# Altium PCB ScreenerMobo.PcbDoc (part 5 of 5)
Units mm, origin at the board's own origin, x right, y up, seen from the top; angles counter-clockwise.
Board outline 145 x 180 mm, 2 copper layers (Top Layer, Bottom Layer); 434 components, 355 nets, 1806 pads, 3000 vias.
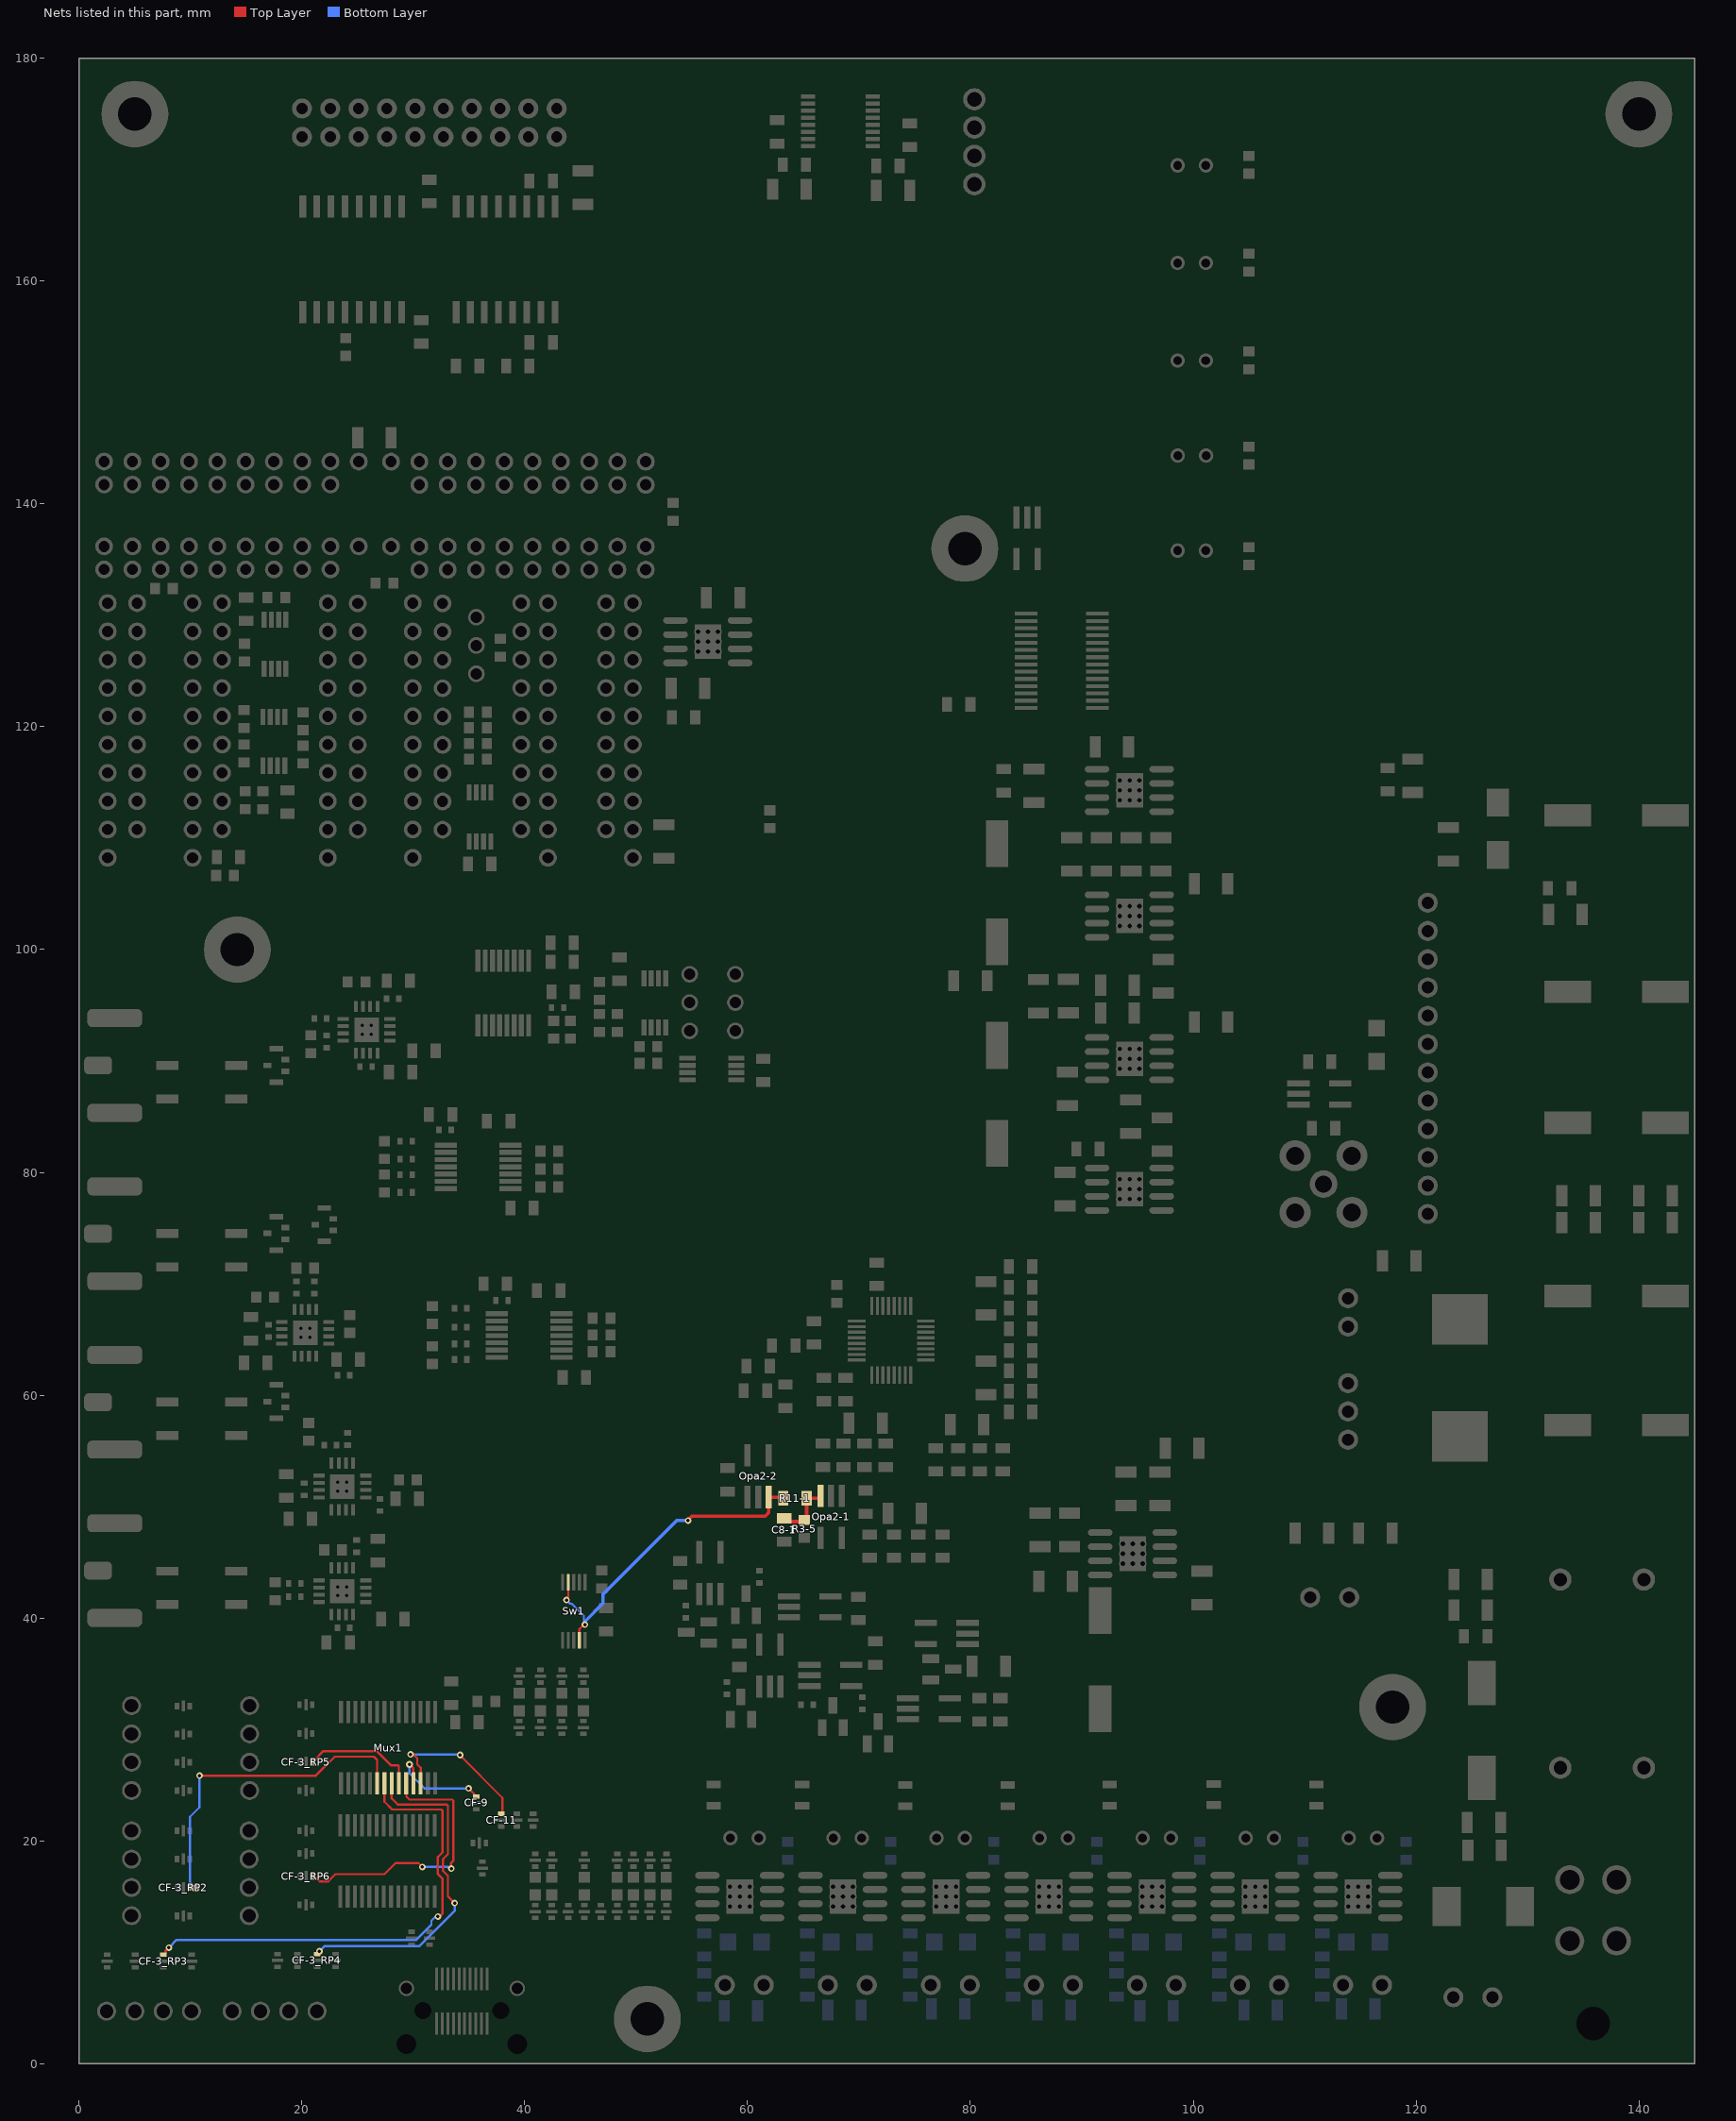
[diagram p5: the nets of this part, all layers, seen from the top]

## Via types
v1: diameter 0.6, hole 0.3, Top Layer to Bottom Layer, tented both sides, 1967 vias
v2: diameter 0.5, hole 0.25, Top Layer to Bottom Layer, tented both sides, 1025 vias
v3: diameter 0.9, hole 0.5, Top Layer to Bottom Layer, tented both sides, 8 vias

## Nets (pads, with @x,y where several pads share a name; then routed paths per layer and width w, separated by ;. In a path a pad name is that pad's centre, name@x,y a point inside that pad or via, vN(x,y) a via of type N, cw(c..) or ccw(c..) an arc to the next point about the centre after c; other vN are vias at no path point) (continued)
VRTDP2: CF-3_RP2.2 Mux1.20 | length 30.2
  Top Layer w0.2: CF-3_RP2.2@9.925,15.8 9.975,15.75 v1(10.5,15.75) ; v1(10.8,25.85) 21.25,25.85 22.95,27.55 26.45,27.55 26.75,27.25 Mux1.20@26.75,25.15
  Bottom Layer w0.2: v1(10.5,15.75) 9.95,16.3 9.95,22.15 10.8,23 v1(10.8,25.85)
VRTDP3: CF-3_RP3.2 Mux1.21 | length 43.7
  Top Layer w0.2: CF-3_RP3.2@7.567,9.775 7.658,9.775 7.758,9.875 7.758,10.108 v1(8.05,10.4) ; Mux1.21@27.4,25.15 27.4,23.5 28.1,22.8 32.507,22.8 32.624,22.683 32.624,18.974 32.2,18.55 32.2,17 32.624,16.576 32.624,13.459 32.507,13.341 32.45,13.341 32.308,13.2 v1(32.2,13.2)
  Bottom Layer w0.2: v1(8.05,10.4) 8.75,11.1 30.25,11.1 31.617,12.467 31.617,12.583 31.623,12.589 31.623,12.823 31.923,13.123 32.123,13.123 v1(32.2,13.2)
VRTDP4: CF-3_RP4.2 Mux1.22 | length 30.8
  Top Layer w0.2: CF-3_RP4.2@21.375,9.85 CF-3_RP4.2@21.35,9.825 21.45,9.825 21.55,9.925 21.55,10.025 21.575,10.05 v1(21.575,10.075) ; Mux1.22@28.05,25.15 28.05,23.8 28.6,23.25 32.983,23.25 33.1,23.133 33.1,18.8 32.65,18.35 32.65,17.3 33.1,16.85 33.1,15 v1(33.7,14.4)
  Bottom Layer w0.2: v1(21.575,10.075) 22.05,10.55 30.55,10.55 33.7,13.7 v1(33.7,14.4)
VRTDP5: CF-3_RP5.2 Mux1.23 | length 10.4
  Top Layer w0.2: CF-3_RP5.2@20.925,27.067 20.925,27.167 21.025,27.267 21.125,27.267 21.908,28.05 26.7,28.05 27.975,26.775 28.625,26.775 28.7,26.7 Mux1.23@28.7,25.15
VRTDP6: CF-3_RP6.2 Mux1.24 | length 25.3
  Top Layer w0.2: CF-3_RP6.2@20.925,16.8 20.925,16.75 21.025,16.65 21.3,16.65 21.6,16.35 22.35,16.35 23,17 27.406,17 28.406,18 30.45,18 v1(30.8,17.65) ; Mux1.24@29.35,25.15 29.375,25.125 29.375,23.975 29.65,23.7 33.483,23.7 33.6,23.583 33.6,18.217 33.366,17.983 33.366,17.534 v1(33.4,17.5)
  Bottom Layer w0.2: v1(30.8,17.65) 33.142,17.65 33.292,17.5 v1(33.4,17.5)
VRTDP7: CF-9.2 Mux1.25 | length 9.3
  Top Layer w0.2: v1(29.65,26.85) 30,26.5 Mux1.25@30,25.15 ; v1(34.95,24.7) CF-9.2@35.492,24.158
  Bottom Layer w0.2: v1(29.65,26.85) 29.65,26.05 31,24.7 v1(34.95,24.7)
VRTDP8: CF-11.2 Mux1.26 | length 14.5
  Top Layer w0.2: v1(29.75,27.75) 30,27.75 30.35,27.4 30.35,26.85 30.65,26.55 Mux1.26@30.65,25.15 ; v1@34.262,27.638 v1(34.2,27.7) 34.2,27.65 38,23.85 CF-11.2@38,22.425
  Bottom Layer w0.2: v1(29.75,27.75) 34.15,27.75 v1(34.2,27.7)
VSenseN: C8-1.1 Opa2-1.3 R3-5.2 R11-1.1 | length 5.3
  Top Layer w0.3: C8-1.1@63.3,48.65 65.1,48.65 65.3,48.85 R11-1.1@65.3,50.75 66.425,50.75 Opa2-1.3@66.55,50.875
VSenseP: Opa2-2.3 R11-1.2 Sw1.4 Sw1.9 | length 29.6
  Top Layer w0.2: v1(43.75,41.6) 43.827,41.677 43.827,41.844 43.9,41.917 Sw1.4@43.9,43.2 ; Sw1.9@44.9,38 44.9,39 v1@45.3,39.4
  Top Layer w0.3: v1(54.65,48.75) 54.65,48.8 55,49.15 61.6,49.15 61.9,49.45 Opa2-2.3@61.9,50.85 R11-1.2@62.9,50.85
  Bottom Layer w0.2: v1(43.75,41.6) 43.75,41.593 44.067,41.276 44.224,41.276 45.3,40.2 45.3,39.7
  Bottom Layer w0.3: v1(45.4,39.4) 45.4,39.7 47,41.3 47,42.1 53.65,48.75 v1(54.65,48.75)
pads on no net: ADC2.13 ADC2.19 ADC2.25 Buf1.1 CLC-1.0 CLC-2.0 CLC-3.0 CLC-4.0 CLC-5.0 CLC-6.0 CLC-7.0 CLC-8.0 CLC-9.0 CLC-10.0 CLC-11.0 Con_S.0 H1.4 H1.5 H1.7 H1.8 H1.9 H1.10 H2.5 Iso-1.2 Iso-1.4 Iso-1.8 Iso-1.10 Iso-1.13 Iso-1.15 LR-3.9 Mux1.3 Mux1.13 Mux1.14 Mux2.3 Mux2.13 Mux2.14 N1.1 Opa1-2.5 Opa1-2.6 Opa1-2.7 OpAmp-1.3 OpAmp-1.5 OpAmp-1.7 OpAmp-1.14 PWM1.16 RF_Mag_1.13 RF_Mag_2.13 RF_Mag_3.13 RF_Mag_4.13 RFS1.0 SWP1_SWP1.3 SWP1_SWP2.3 SWP1_SWP3.3 SWP1_SWP4.3 SWP1_SWP5.3 SWP1_SWP6.3 SWP1_SWP7.3 VReg-1.12 VReg-5.6 VReg-6.6 VReg-7.6

## Polygon pours and split planes (outlines as drawn)
GND on Bottom Layer "PLN1" (solid, remove dead copper, pour order 2): 55.057,27.061 54.257,26.261 54.257,0.061 54.207,0.011 0.007,0.011 0.007,34.211 0.957,35.161 32.057,35.161 37.757,40.861 37.757,44.411 66.257,72.911 99.357,72.911 102.957,69.311 102.957,42.061 104.457,40.561 107.757,40.561 107.757,27.061
GND on Bottom Layer "PLN1" (solid, pour order 0): 55,25 55,0 145,0 145,120.8 107.65,120.8 107.65,25.1
GND on Bottom Layer "PLN1" (solid, pour order 7): 107.791,74.25 65.3,74.25 36.55,45.5 36.55,41.15 32.2,36.8 1.55,36.8 0,38.35 0,102.75 59.85,102.75 60.85,103.75 60.85,119.2 62.35,120.7 106.25,120.7 106.7,120.25 106.7,84.9 108.05,84.9 108.1,84.95
GND on Bottom Layer "PLN1" (solid, pour order 5): 139.5,118.75 139.5,121.8 58.6,121.8 58.6,103.95 0,103.95 0,159.95 145,159.95 145,118.7
GND on Top Layer "PLN1" (solid, remove dead copper, pour order 3): 55.05,27.05 54.25,26.25 54.25,0.05 54.2,0 0,0 0,34.2 0.95,35.15 32.9,35.15 37.75,40 37.75,44.4 66.25,72.9 99.35,72.9 102.95,69.3 102.95,42.05 104.45,40.55 107.75,40.55 107.75,27.05
GND on Top Layer "PLN1" (solid, pour order 6): 107.8,74.55 65.6,74.55 36.55,45.5 36.55,41.15 32.2,36.8 1.55,36.8 0,38.35 0,102.75 59.85,102.75 60.85,103.75 60.85,119.2 62.35,120.7 106.25,120.7 106.7,120.25 106.7,84.9 108.05,84.9 108.1,84.95
GND on Top Layer "PLN1" (solid, pour order 1): 55,25.75 55,0 145,0 145,120.8 107.65,120.8 107.65,25.85
GND on Top Layer "PLN1" (solid, pour order 4): 139.5,118.75 139.5,121.8 58.6,121.8 58.6,103.95 0,103.95 0,159.95 145,159.95 145,118.7

## Silkscreen, mask and mechanical layers (free items; w line width, h text height)
Top Overlay:
  drawing of 35 lines, arcs and shapes, not listed
  text "Power (12V)" at 108.8,169.4 h2.5
  text "Hall-Iso" at 86.85,167.3 h1.5 r90
  text "SyncBoard HB" at 108.8,160.683 h2.5
  text "NuMBAT V1.1" at 38.1,153.8 h4.7
  text "Sensors On" at 108.8,151.9 h2.5
  text "B (Hall)" at 18.45,147.3 h2.5
  text "H. Steel & G. Abrahams / 19/8/2026" at 41.25,146.4 h2.2
  text "Fluxgate On" at 108.8,143.083 h2.5
  text "RF Monitor On" at 108.8,134.65 h2.5
  text "|In|" at 3.2,102.6 h2.5
  text "|S/In|" at 20.6,102.6 h2.5
  text "<S/In" at 40,102.6 h2.5
  text "RF 1" at 0.7,95.8 h2
  text "RF 2" at 0.7,80.8 h2
  text "Rf-Sw" at 108,71.8 h1.75
  text "RF 3" at 0.7,65.7 h2
  text "RF Sp" at 0.7,50.166 h2
  text "RTD1" at 1.75,34.35 h1
  text "RTD5" at 11.95,34.2 h1
  text "+5V" at 111.25,30.9 h1.75 r90
  text "-5V" at 114.95,30.85 h1.75 r90
  text "Sw1" at 58.05,23.3 h2
  text "Sw2" at 67.067,23.3 h2
  text "Sw3" at 76.083,23.3 h2
  text "Sw4" at 85.1,23.3 h2
  text "Sw5" at 94.117,23.3 h2
  text "Sw6" at 103.133,23.3 h2
  text "Sw7" at 112.15,23.3 h2
  text "RTD6" at 19.85,11.55 h1
  text "RTD2" at 8.1,11.4 h1
  text "12V" at 143.6,10.9 h2.5 r90
  text "RTD3" at 0.4,10.1 h1
  text "RTD4" at 12.45,8.95 h1
  text "GND" at 121.25,1.35 h1.5 r90
Mechanical 1:
  the board outline again, w0.1

## Text inside footprints (layer, text, board x,y; h text height)
ADC1: Top Overlay "1" at 36.85,94.95 h0.5 r90
CE1-1: Top Overlay "+" at 127.279,42.978 h0.5
CE2-1: Top Overlay "+" at 127.279,26.078 h0.5
HRTD1_RP1: Top Overlay "D+" at 0.3,32.73 h0.7 r270; Top Overlay "D-" at 0.3,30.197 h0.7 r270; Top Overlay "S+" at 0.3,27.657 h0.7 r270; Top Overlay "S-" at 0.3,24.93 h0.7 r270
HRTD1_RP2: Top Overlay "D+" at 0.3,21.49 h0.7 r270; Top Overlay "D-" at 0.3,18.957 h0.7 r270; Top Overlay "S+" at 0.3,16.417 h0.7 r270; Top Overlay "S-" at 0.3,13.69 h0.7 r270
HRTD1_RP3: Top Overlay "D+" at 1.86,0.5 h0.7; Top Overlay "D-" at 4.393,0.5 h0.7; Top Overlay "S+" at 6.933,0.5 h0.7; Top Overlay "S-" at 9.66,0.5 h0.7
HRTD1_RP4: Top Overlay "D+" at 13.13,0.5 h0.7; Top Overlay "D-" at 15.663,0.5 h0.7; Top Overlay "S+" at 18.203,0.5 h0.7; Top Overlay "S-" at 20.93,0.5 h0.7
HRTD1_RP5: Top Overlay "D+" at 10.9,32.73 h0.7 r270; Top Overlay "D-" at 10.9,30.197 h0.7 r270; Top Overlay "S+" at 10.9,27.657 h0.7 r270; Top Overlay "S-" at 10.9,24.93 h0.7 r270
HRTD1_RP6: Top Overlay "D+" at 10.85,21.49 h0.7 r270; Top Overlay "D-" at 10.85,18.957 h0.7 r270; Top Overlay "S+" at 10.85,16.417 h0.7 r270; Top Overlay "S-" at 10.85,13.69 h0.7 r270
J1-1: Top Overlay "1" at 57.064,92.506 h0.5 r90; Top Overlay "2" at 57.064,95.046 h0.5 r90; Top Overlay "3" at 57.064,97.586 h0.5 r90
J1-2: Top Overlay "1" at 61.164,92.506 h0.5 r90; Top Overlay "2" at 61.164,95.046 h0.5 r90; Top Overlay "3" at 61.164,97.586 h0.5 r90
J1-3: Top Overlay "1" at 33.386,130.034 h0.5 r270; Top Overlay "2" at 33.386,127.494 h0.5 r270; Top Overlay "3" at 33.386,124.954 h0.5 r270
Opa1-1: Top Overlay "1" at 50.2,93.3 h0.5 r90
Opa1-2: Top Overlay "1" at 54.954,90.892 h0.5
Opa1-3: Top Overlay "1" at 19.092,120.546 h0.5 r270
Opa1-4: Top Overlay "1" at 15.958,125.554 h0.5 r90
Opa1-5: Top Overlay "1" at 37.592,113.746 h0.5 r270
RF_PM_1: Top Overlay "1" at 34.65,81.4 h0.5
RF_PM_2: Top Overlay "1" at 39.25,66.25 h0.5